# EAGLE board uMeadow_RevA (EAGLE 9.1.3), part 1 of 3
uMeadow eval Kit.
DATE: 09/16/2018; ENGINEER: S.JOHNSON; PART_NUMBER: uMeadow; REV: A
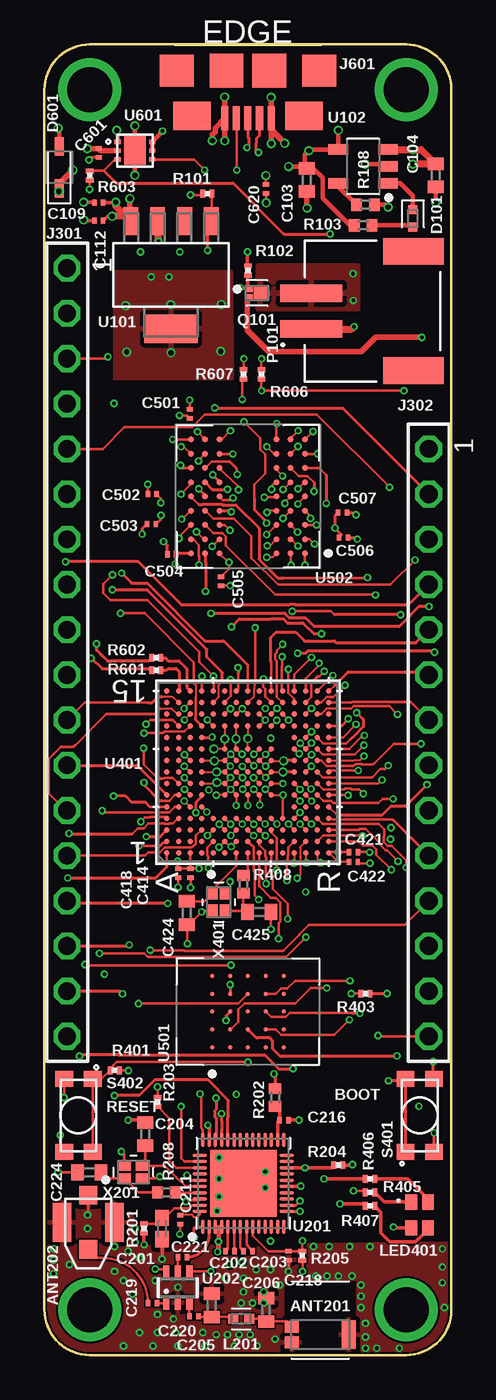
[diagram p0: board, top side]
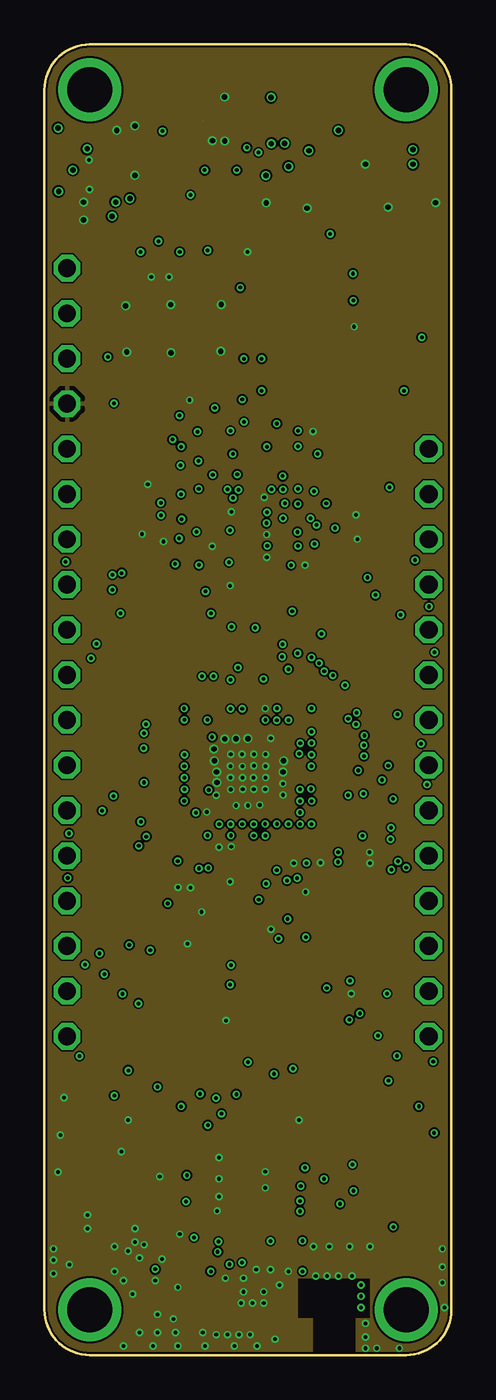
[diagram p1: board, inner layer Route2]
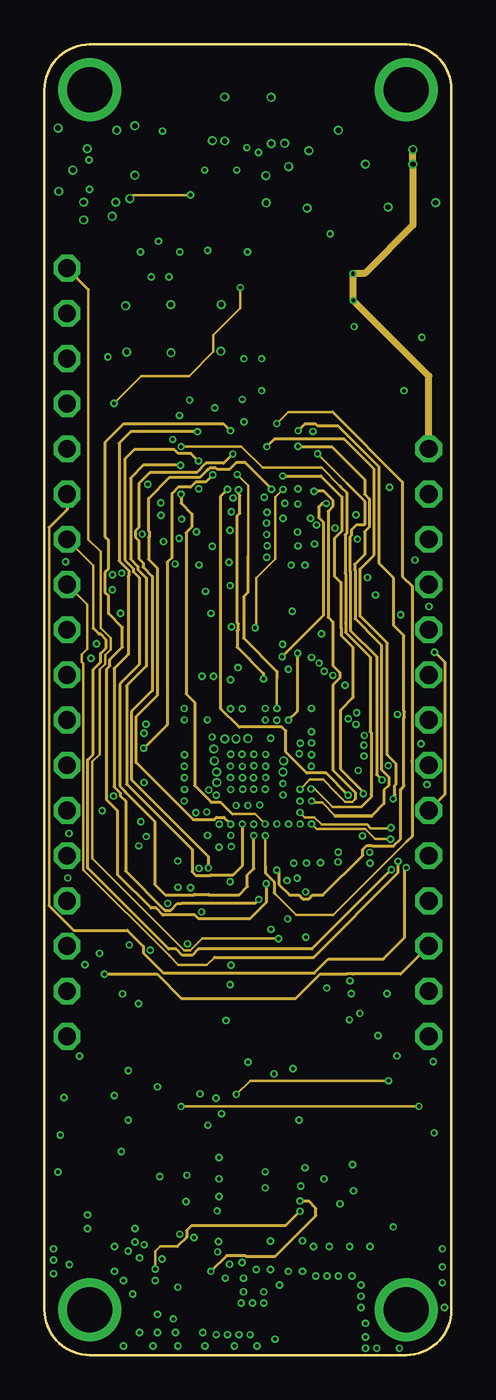
[diagram p2: board, inner layer Route3]
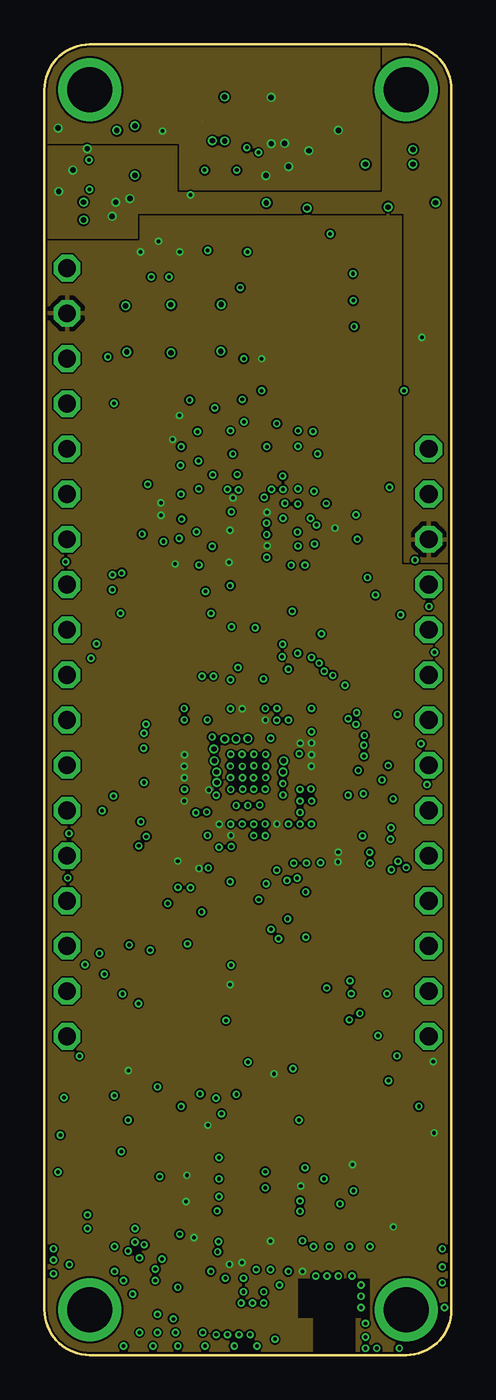
[diagram p3: board, inner layer Route14]
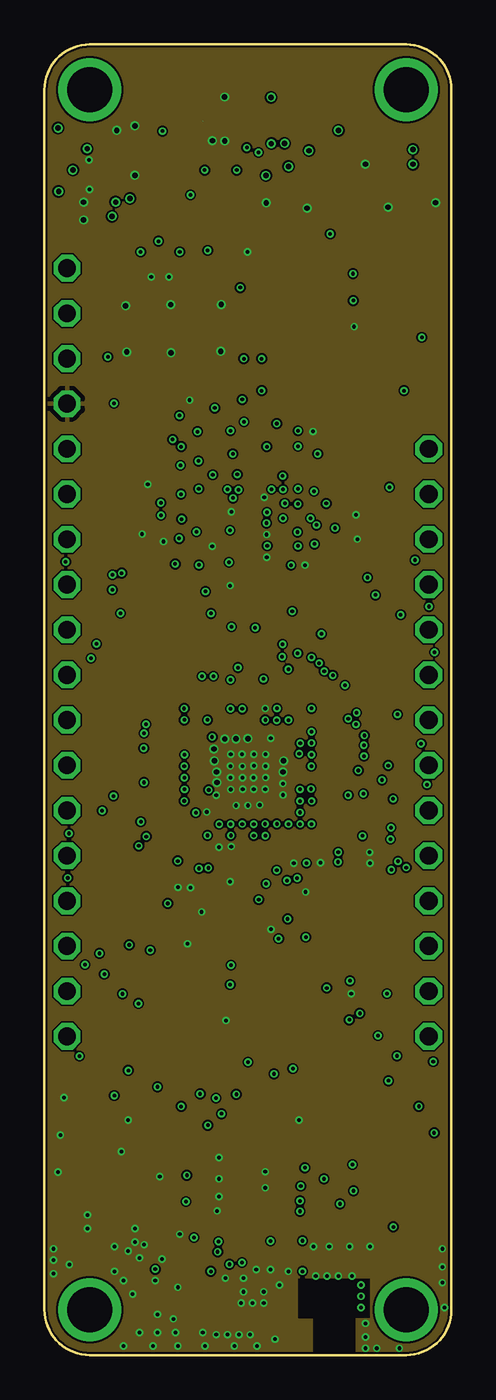
[diagram p4: board, inner layer Route15]
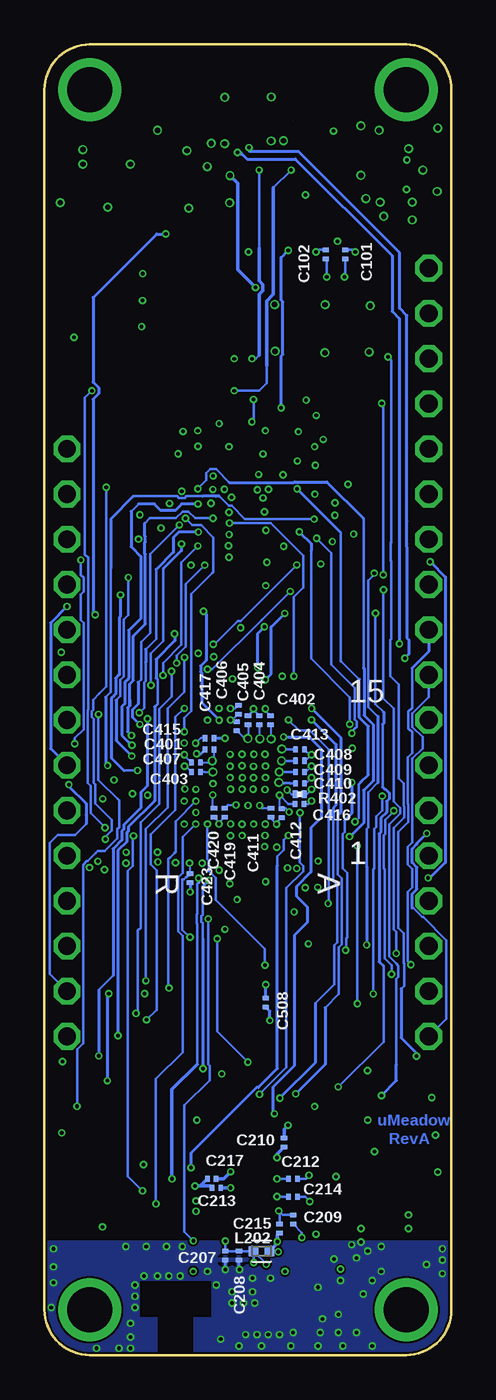
[diagram p5: board, bottom side, seen from below]

Size 22.86 x 73.66 mm. Coordinates in mm from the lower left corner, seen from the top.
Outline: 0,71.12 0,2.54 arc90 2.54,0 20.32,0 arc90 22.86,2.54 22.86,71.12 arc90 20.32,73.66 2.54,73.66 arc90 0,71.12
Copper layers (1*2+3*14+15*16): Top 0.035mm / dielectric 0.15mm / Route2 0.035mm / dielectric 0.15mm / Route3 0.035mm / dielectric 0.3mm / Route14 0.035mm / dielectric 0.15mm / Route15 0.035mm / dielectric 0.15mm / Bottom 0.035mm
Design rules "default *": minimum track width 0.1mm, minimum drill 0.15mm, track to track 0.1mm, track to pad 0.1mm, pad to pad 4mil, via to via 4mil, smd to smd 0mil, copper to edge 0.1mm, drill to drill 6mil, minimum pad ring 0.1mm, minimum via ring 4mil, stop-mask expansion 1mil, vias tented up to drill 20mil, thermal gap 10mil
Net classes: 1 USB: width 0.165 mm, drill 0.102 mm, clearance 0.254 mm; 2 MEM_ADDR_CNT: width 0.102 mm, drill 0.102 mm; 3 MEM_DATA: width 0.102 mm; 4 5V: width 0.1 mm; 5 50ohm: width 0.1 mm; 6 POWER: width 0.1 mm, drill 0.203 mm; 7 CLK: width 0.1 mm, drill 0.203 mm; 8 ANT: clearance 0.3 mm

## Footprints (pad centres in the part's own frame; a part is rotated, then mirrored left to right if it is on the bottom)
W3008 = smd 0.8 x 0.65: 1 1.6,-0.425; 2 1.6,0.425 | smd 0.8 x 1.6: 3 -1.6,0
A-1JB = smd 2.2 x 1.05: GND 0,1.475; GND2 0,-1.475 | smd 1.05 x 1: GND1 -1.525,0; SIG 1.525,0
C0201 = smd 0.25 x 0.35: 1 -0.25,0; 2 0.25,0
C0402 = smd 0.7 x 0.9: 1 -0.65,0; 2 0.65,0
C0402K = smd 0.925 x 0.74: 1 -0.6,0; 2 0.6,0
LEDC1005X50 = smd 0.5 x 0.5: 1 -0.5,0; 2 0.5,0
SOD2512X117 = smd 1.054 x 0.53: 1 -1.181,0; 2 1.181,0
TSW-118-XX-G-S = drill 1 pad 1.5 octagon: 1 21.59,0; 2 19.05,0; 3 16.51,0; 4 13.97,0; 5 11.43,0; 6 8.89,0; 7 6.35,0; 8 3.81,0; 9 1.27,0; 10 -1.27,0; 11 -3.81,0; 12 -6.35,0; 13 -8.89,0; 14 -11.43,0; 15 -13.97,0; 16 -16.51,0; 17 -19.05,0; 18 -21.59,0
TSW-114-XX-G-S = drill 1 pad 1.5 octagon: 1 16.51,0; 2 13.97,0; 3 11.43,0; 4 8.89,0; 5 6.35,0; 6 3.81,0; 7 1.27,0; 8 -1.27,0; 9 -3.81,0; 10 -6.35,0; 11 -8.89,0; 12 -11.43,0; 13 -13.97,0; 14 -16.51,0
USB_OTG = smd 0.4 x 1.35: 1 -1.3,2.675; 2 -0.65,2.675; 3 0,2.675; 4 0.65,2.675; 5 1.3,2.675 | smd 2.1 x 1.6: SHD1 3.15,2.55; SHD2 -3.15,2.55 | smd 1.9 x 1.9: SHD3 1.2,0; SHD4 -1.2,0 | smd 1.9 x 1.8: SHD5 -4,0; SHD6 4,0
L0402 = smd 0.556 x 0.559: 1 -0.452,0; 2 0.452,0
LTST-C19HE1WT = smd 0.65 x 0.85: 1 -0.475,0.725; 2 0.475,0.725; 3 0.475,-0.725; 4 -0.475,-0.725
MTH_100_140MIL = drill 2.54 pad 3.556: P$1 0,0
JST_S2B-PH-SM4-TB(LF)(SN) = smd 1 x 3.5: 1 1,0; 2 -1,0 | smd 1.5 x 3.4: P1 3.35,5.75; P2 -3.35,5.75
DFN120X80X50-3 = smd 0.36 x 0.35: 1 -0.42,0.225; 2 -0.42,-0.225 | smd 0.76 x 0.772: 3 0.195,0
R0201 = smd 0.28 x 0.43: 1 -0.255,0; 2 0.255,0
R0402 = smd 0.6 x 0.7: 1 -0.5,0; 2 0.5,0
KMR211NG = smd 0.9 x 1: 1 -2.05,0.8; 2 2.05,0.8; 3 2.05,-0.8; 4 -2.05,-0.8
SOT150P696X180-5N = smd 1.6 x 0.838: 1 -3.023,2.261; 2 -3.023,0.762; 3 -3.023,-0.762; 4 -3.023,-2.261 | smd 1.6 x 2.997: 5 3.023,0
SOT95P270X145-5 = smd 1.1 x 0.6: 1 -1.4,0.95; 2 -1.4,0; 3 -1.4,-0.95; 4 1.4,-0.95; 5 1.4,0.95
QFN35P500X500X90-49N = smd 0.81 x 0.2: 1 -2.445,2.275; 2 -2.445,1.925; 3 -2.445,1.575; 4 -2.445,1.225; 5 -2.445,0.875; 6 -2.445,0.525; 7 -2.445,0.175; 8 -2.445,-0.175; 9 -2.445,-0.525; 10 -2.445,-0.875; 11 -2.445,-1.225; 12 -2.445,-1.575; 13 -2.445,-1.925; 14 -2.445,-2.275; 25 2.445,-2.275; 26 2.445,-1.925; 27 2.445,-1.575; 28 2.445,-1.225; 29 2.445,-0.875; 30 2.445,-0.525; 31 2.445,-0.175; 32 2.445,0.175; 33 2.445,0.525; 34 2.445,0.875; 35 2.445,1.225; 36 2.445,1.575; 37 2.445,1.925; 38 2.445,2.275 | smd 0.2 x 0.81: 15 -1.575,-2.445; 16 -1.225,-2.445; 17 -0.875,-2.445; 18 -0.525,-2.445; 19 -0.175,-2.445; 20 0.175,-2.445; 21 0.525,-2.445; 22 0.875,-2.445; 23 1.225,-2.445; 24 1.575,-2.445; 39 1.575,2.445; 40 1.225,2.445; 41 0.875,2.445; 42 0.525,2.445; 43 0.175,2.445; 44 -0.175,2.445; 45 -0.525,2.445; 46 -0.875,2.445; 47 -1.225,2.445; 48 -1.575,2.445 | smd 3.75 x 3.75: 49 0,0
SC70-6L = smd 0.35 x 0.8: 1 -0.65,-0.85; 2 0,-0.85; 3 0.65,-0.85; 4 0.65,0.85; 5 0,0.85; 6 -0.65,0.85
UFBGA-176 = smd 0.3 x 0.3: A1 -4.55,4.55; A2 -3.9,4.55; A3 -3.25,4.55; A4 -2.6,4.55; A5 -1.95,4.55; A6 -1.3,4.55; A7 -0.65,4.55; A8 0,4.55; A9 0.65,4.55; A10 1.3,4.55; A11 1.95,4.55; A12 2.6,4.55; A13 3.25,4.55; A14 3.9,4.55; A15 4.55,4.55; B1 -4.55,3.9; B2 -3.9,3.9; B3 -3.25,3.9; B4 -2.6,3.9; B5 -1.95,3.9; B6 -1.3,3.9; B7 -0.65,3.9; B8 0,3.9; B9 0.65,3.9; B10 1.3,3.9; B11 1.95,3.9; B12 2.6,3.9; B13 3.25,3.9; B14 3.9,3.9; B15 4.55,3.9; C1 -4.55,3.25; C2 -3.9,3.25; C3 -3.25,3.25; C4 -2.6,3.25; C5 -1.95,3.25; C6 -1.3,3.25; C7 -0.65,3.25; C8 0,3.25; C9 0.65,3.25; C10 1.3,3.25; C11 1.95,3.25; C12 2.6,3.25; C13 3.25,3.25; C14 3.9,3.25; C15 4.55,3.25; D1 -4.55,2.6; D2 -3.9,2.6; D3 -3.25,2.6; D4 -2.6,2.6; D5 -1.95,2.6; D6 -1.3,2.6; D7 -0.65,2.6; D8 0,2.6; D9 0.65,2.6; D10 1.3,2.6; D11 1.95,2.6; D12 2.6,2.6; D13 3.25,2.6; D14 3.9,2.6; D15 4.55,2.6; E1 -4.55,1.95; E2 -3.9,1.95; E3 -3.25,1.95; E4 -2.6,1.95; E12 2.6,1.95; E13 3.25,1.95; E14 3.9,1.95; E15 4.55,1.95; F1 -4.55,1.3; F2 -3.9,1.3; F3 -3.25,1.3; F4 -2.6,1.3; F6 -1.3,1.3; F7 -0.65,1.3; F8 0,1.3; F9 0.65,1.3; F10 1.3,1.3; F12 2.6,1.3; F13 3.25,1.3; F14 3.9,1.3; F15 4.55,1.3; G1 -4.55,0.65; G2 -3.9,0.65; G3 -3.25,0.65; G4 -2.6,0.65; G6 -1.3,0.65; G7 -0.65,0.65; G8 0,0.65; G9 0.65,0.65; G10 1.3,0.65; G12 2.6,0.65; G13 3.25,0.65; G14 3.9,0.65; G15 4.55,0.65; H1 -4.55,0; H2 -3.9,0; H3 -3.25,0; H4 -2.6,0; H6 -1.3,0; H7 -0.65,0; H8 0,0; H9 0.65,0; H10 1.3,0; H12 2.6,0; H13 3.25,0; H14 3.9,0; H15 4.55,0; J1 -4.55,-0.65; J2 -3.9,-0.65; J3 -3.25,-0.65; J4 -2.6,-0.65; J6 -1.3,-0.65; J7 -0.65,-0.65; J8 0,-0.65; J9 0.65,-0.65; J10 1.3,-0.65; J12 2.6,-0.65; J13 3.25,-0.65; J14 3.9,-0.65; J15 4.55,-0.65; K1 -4.55,-1.3; K2 -3.9,-1.3; K3 -3.25,-1.3; K4 -2.6,-1.3; K6 -1.3,-1.3; K7 -0.65,-1.3; K8 0,-1.3; K9 0.65,-1.3; K10 1.3,-1.3; K12 2.6,-1.3; K13 3.25,-1.3; K14 3.9,-1.3; K15 4.55,-1.3; L1 -4.55,-1.95; L2 -3.9,-1.95; L3 -3.25,-1.95; L4 -2.6,-1.95; L12 2.6,-1.95; L13 3.25,-1.95; L14 3.9,-1.95; L15 4.55,-1.95; M1 -4.55,-2.6; M2 -3.9,-2.6; M3 -3.25,-2.6; M4 -2.6,-2.6; M5 -1.95,-2.6; M6 -1.3,-2.6; M7 -0.65,-2.6; M8 0,-2.6; M9 0.65,-2.6; M10 1.3,-2.6; M11 1.95,-2.6; M12 2.6,-2.6; M13 3.25,-2.6; M14 3.9,-2.6; M15 4.55,-2.6; N1 -4.55,-3.25; N2 -3.9,-3.25; N3 -3.25,-3.25; N4 -2.6,-3.25; N5 -1.95,-3.25; N6 -1.3,-3.25; N7 -0.65,-3.25; N8 0,-3.25; N9 0.65,-3.25; N10 1.3,-3.25; N11 1.95,-3.25; N12 2.6,-3.25; N13 3.25,-3.25; N14 3.9,-3.25; N15 4.55,-3.25; P1 -4.55,-3.9; P2 -3.9,-3.9; P3 -3.25,-3.9; P4 -2.6,-3.9; P5 -1.95,-3.9; P6 -1.3,-3.9; P7 -0.65,-3.9; P8 0,-3.9; P9 0.65,-3.9; P10 1.3,-3.9; P11 1.95,-3.9; P12 2.6,-3.9; P13 3.25,-3.9; P14 3.9,-3.9; P15 4.55,-3.9; R1 -4.55,-4.55; R2 -3.9,-4.55; R3 -3.25,-4.55; R4 -2.6,-4.55; R5 -1.95,-4.55; R6 -1.3,-4.55; R7 -0.65,-4.55; R8 0,-4.55; R9 0.65,-4.55; R10 1.3,-4.55; R11 1.95,-4.55; R12 2.6,-4.55; R13 3.25,-4.55; R14 3.9,-4.55; R15 4.55,-4.55
BGA25C100P5X5_800X600X120 = smd 0.25 x 0.25: A1 -2,2; A2 -1,2; A3 0,2; A4 1,2; A5 2,2; B1 -2,1; B2 -1,1; B3 0,1; B4 1,1; B5 2,1; C1 -2,0; C2 -1,0; C3 0,0; C4 1,0; C5 2,0; D1 -2,-1; D2 -1,-1; D3 0,-1; D4 1,-1; D5 2,-1; E1 -2,-2; E2 -1,-2; E3 0,-2; E4 1,-2; E5 2,-2
BGA81C80P9X9_800X800X120 = smd 0.35 x 0.35: A1 -3.2,3.2; A2 -2.4,3.2; A3 -1.6,3.2; A7 1.6,3.2; A8 2.4,3.2; A9 3.2,3.2; B1 -3.2,2.4; B2 -2.4,2.4; B3 -1.6,2.4; B7 1.6,2.4; B8 2.4,2.4; B9 3.2,2.4; C1 -3.2,1.6; C2 -2.4,1.6; C3 -1.6,1.6; C7 1.6,1.6; C8 2.4,1.6; C9 3.2,1.6; D1 -3.2,0.8; D2 -2.4,0.8; D3 -1.6,0.8; D7 1.6,0.8; D8 2.4,0.8; D9 3.2,0.8; E1 -3.2,0; E2 -2.4,0; E3 -1.6,0; E7 1.6,0; E8 2.4,0; E9 3.2,0; F1 -3.2,-0.8; F2 -2.4,-0.8; F3 -1.6,-0.8; F7 1.6,-0.8; F8 2.4,-0.8; F9 3.2,-0.8; G1 -3.2,-1.6; G2 -2.4,-1.6; G3 -1.6,-1.6; G7 1.6,-1.6; G8 2.4,-1.6; G9 3.2,-1.6; H1 -3.2,-2.4; H2 -2.4,-2.4; H3 -1.6,-2.4; H7 1.6,-2.4; H8 2.4,-2.4; H9 3.2,-2.4; J1 -3.2,-3.2; J2 -2.4,-3.2; J3 -1.6,-3.2; J7 1.6,-3.2; J8 2.4,-3.2; J9 3.2,-3.2
U-DFN2018-6 = smd 0.35 x 0.25: 1 -0.975,0.5; 2 -0.975,0; 3 -0.975,-0.5; 4 0.975,-0.5; 5 0.975,0; 6 0.975,0.5 | smd 1.2 x 1.6: TAB 0,0
OSCCC160X120X40 = smd 0.73 x 0.58: 1 -0.5,-0.35; 2 0.5,-0.35; 3 0.5,0.35; 4 -0.5,0.35

## Placement (x,y rotation side)
ANT201  w3008  [W3008]  15.49,1.14 180 top
ANT202  A-1JB  [A-1JB]  2.46,7.47 270 top
C101  0.1uF  [C0201]  5.96,61.87 270 bottom
C102  1uF  [C0201]  7.05,61.87 270 bottom
C103  4.7uF  [C0402]  14.73,66.04 270 top
C104  4.7uF  [C0402]  21.97,66.29 270 top
C109  0.1uF  [C0201]  3.05,64.77 180 top
C112  1uF  [C0201]  3.05,63.75 180 top
C201  3nF  [C0402K]  6.6,7.11 90 top
C202  0.1uF  [C0201]  10.41,5.84 0 top
C203  0.1uF  [C0201]  11.43,5.84 0 top
C204  8pF  [C0402]  5.65,12.43 90 top
C205  6pF  [C0402]  9.4,2.79 90 top
C206  6.2pF  [C0402]  12.45,2.54 90 top
C207  0.1uF  [C0201]  12.7,5.59 270 bottom
C208  1uF  [C0201]  11.94,5.59 270 bottom
C209  0.1uF  [C0201]  8.89,7.62 90 bottom
C210  1uF  [C0201]  9.4,11.94 270 bottom
C211  10nF  [C0201]  7.62,7.62 90 top
C212  1uF  [C0201]  8.89,9.91 180 bottom
C213  0.1uF  [C0201]  13.21,9.4 0 bottom
C214  0.1uF  [C0201]  8.89,8.89 180 bottom
C215  0.1uF  [C0201]  9.65,7.11 90 bottom
C216  0.1uF  [C0201]  13.46,13.21 0 top
C217  100pF  [C0201]  13.46,9.91 0 bottom
C218  0.1uF  [C0201]  13.72,5.59 270 top
C219  100pF  [C0201]  6.07,2.92 0 top
C220  100pF  [C0201]  8.41,2.18 180 top
C221  100pF  [C0201]  7.75,5.51 0 top
C224  8pF  [C0402]  2.51,10.28 180 top
C401  2.2uF  [C0201]  13.59,34.04 0 bottom
C402  2.2uF  [C0201]  10.16,35.69 270 bottom
C403  0.1uF  [C0201]  14.35,32.77 0 bottom
C404  1uF  [C0201]  10.79,35.69 270 bottom
C405  0.1uF  [C0201]  11.42,35.68 270 bottom
C406  0.1uF  [C0201]  11.97,36.27 90 bottom
C407  0.1uF  [C0201]  14.35,33.31 0 bottom
C408  0.1uF  [C0201]  8.51,33.4 180 bottom
C409  0.1uF  [C0201]  8.51,32.77 180 bottom
C410  0.1uF  [C0201]  8.51,32.13 180 bottom
C411  0.1uF  [C0201]  10.13,30.49 90 bottom
C412  0.1uF  [C0201]  9.53,30.46 90 bottom
C413  0.1uF  [C0201]  8.51,34.04 180 bottom
C414  0.1uF  [C0201]  8.2,27.09 270 top
C415  0.1uF  [C0201]  13.59,34.67 0 bottom
C416  0.1uF  [C0201]  8.52,30.97 180 bottom
C417  0.1uF  [C0201]  12.06,35.34 270 bottom
C418  0.1uF  [C0201]  7.51,27.09 270 top
C419  1uF  [C0201]  12.73,30.49 90 bottom
C420  0.1uF  [C0201]  13.34,30.48 90 bottom
C421  0.1uF  [C0201]  17.35,28.26 0 top
C422  1uF  [C0201]  17.35,27.72 0 top
C423  0.1uF  [C0201]  14.68,26.79 270 bottom
C424  8pF  [C0402]  8,24.85 270 top
C425  8pF  [C0402]  12.06,24.89 0 top
C501  0.1uF  [C0201]  8.16,52.91 90 top
C502  0.1uF  [C0201]  6.05,48.39 180 top
C503  0.1uF  [C0201]  6,46.7 180 top
C504  1uF  [C0201]  7.15,45 180 top
C505  0.1uF  [C0201]  9.92,43.49 270 top
C506  1uF  [C0201]  16.79,45.94 0 top
C507  0.1uF  [C0201]  16.74,47.35 0 top
C508  0.1uF  [C0201]  10.43,19.8 270 bottom
C601  0.1uF  [C0201]  3.05,67.56 270 top
C620  4.7uF  [C0201]  12.45,65.53 270 top
D101  QBLP595-O  [LEDC1005X50]  20.7,63.88 270 top
D601  BAT60JFILM  [SOD2512X117]  0.83,66.75 90 top
DRILEGEND  [DRILEGEND]  -127.52,-69.01 0 top  (outside the outline)
J301  TSW-118-07-G-S  [TSW-118-XX-G-S]  1.27,39.5 90 top
J302  TSW-114-07-G-S  [TSW-114-XX-G-S]  21.59,34.42 90 top
J601  USB_OTG_ZX62-AB-5PA  [USB_OTG]  11.43,72.19 180 top
L201  1.5nH  [L0402]  11.05,2.03 180 top
L202  2nh  [L0402]  10.67,5.84 180 bottom
LED401  LTST-C19HE1WT  [LTST-C19HE1WT]  21.08,7.87 0 top
MTH1  100MIL_140MIL  [MTH_100_140MIL]  2.54,2.54 0 top
MTH2  100MIL_140MIL  [MTH_100_140MIL]  20.32,2.54 0 top
MTH3  100MIL_140MIL  [MTH_100_140MIL]  2.54,71.12 0 top
MTH4  100MIL_140MIL  [MTH_100_140MIL]  20.32,71.12 0 top
P101  S2B-PH-SM4-TB(LF)(SN)  [JST_S2B-PH-SM4-TB(LF)(SN)]  14.99,58.67 270 top
Q101  SSM3J46CTB  [DFN120X80X50-3]  11.94,59.69 0 top
R101  10K  [R0201]  9.14,65.28 180 top
R102  10K  [R0201]  11.43,60.96 270 top
R103  470  [R0402]  17.91,63.5 0 top
R108  4.7K  [R0402]  18.03,64.64 0 top
R201  20K  [R0201]  5.59,7.11 270 top
R202  00  [R0402]  12.95,14.48 270 top
R203  499  [R0201]  6.35,14.22 90 top
R204  20K  [R0201]  16.51,10.67 180 top
R205  10K  [R0201]  14.48,5.59 270 top
R208  00  [R0402]  6.86,9.14 180 top
R401  10K  [R0201]  3.94,16 0 top
R402  10K  [R0201]  8.52,31.52 180 bottom
R403  10K  [R0201]  18.03,20.32 0 top
R405  620  [R0201]  18.29,9.14 0 top
R406  300  [R0201]  18.29,9.91 0 top
R407  300  [R0201]  18.29,8.38 0 top
R408  00  [R0402]  11.18,26.45 90 top
R601  0R  [R0201]  6.28,38.49 180 top
R602  0R  [R0201]  6.27,39.18 180 top
R603  10K  [R0201]  2.54,66.29 90 top
R606  47K  [R0201]  12.19,55.12 90 top
R607  0R  [R0201]  11.18,55.12 90 top
S401  SPST_SW_KMR211NG_LFS  [KMR211NG]  21.08,13.46 90 top
S402  SPST_SW_KMR211NG_LFS  [KMR211NG]  1.91,13.46 270 top
U101  LP38693MP-3.3  [SOT150P696X180-5N]  7.11,60.71 270 top
U102  MCP7381-2-0T  [SOT95P270X145-5]  17.91,66.8 180 top
U201  ESP32-D2WD  [QFN35P500X500X90-49N]  11.18,9.65 90 top
U202  SKYA21001  [SC70-6L]  7.49,3.78 0 top
U401  STM32F777  [UFBGA-176]  11.43,32.77 90 top
U501  32MB  [BGA25C100P5X5_800X600X120]  11.43,19.3 90 top
U502  32MB  [BGA81C80P9X9_800X800X120]  11.43,48.26 180 top
U601  AP2151  [U-DFN2018-6]  5.08,67.69 0 top
X201  ABM12W-40  [OSCCC160X120X40]  5,10.28 0 top
X401  ABM12W-25  [OSCCC160X120X40]  9.8,25.46 270 top

## Library data of the parts
ANT201 = SLJ_wireless; MANUFACTURER: PulseLarsen; PART_NUMBER: W3008
ANT202 = SLJ_wireless; MANUFACTURER: amphenol RF; PART_NUMBER: A-1JB
C101 = eagle-ltspice; FOOTPRINT: 0201; MANUFACTURER: Murata Electronica; PART_NUMBER: GRM033C71A104KE14D; SPICEMODEL: NONE; SPICEPREFIX: C; VOLTAGE: 10V
C102 C112 C208 C210 C212 C404 C419 C422 C504 C506 = eagle-ltspice; FOOTPRINT: 0201; MANUFACTURER: Murata Electronica; PART_NUMBER: GRT033R60J105ME13D; SPICEMODEL: NONE; SPICEPREFIX: C; VOLTAGE: 6.3V
C103 C104 = rcl; MANUFACTURER: MURATA; PACKAGE: 0402; PART_NUMBER: GRM155R60J475ME87D; SPICEPREFIX: C
C109 C207 C209 C213-C216 C218 C403 C405-C418 C420 C421 C423 C501-C503 C505 C507 C508 C601 = eagle-ltspice; FOOTPRINT: 0201; MANUFACTURER: Murata Electronica; PART_NUMBER: GRM033R61A104ME15D; SPICEMODEL: NONE; SPICEPREFIX: C; VOLTAGE: 10V
C201 = rcl; FOOTPRINT: 0402; MANUFACTURER: MURATA; PART_NUMBER: GRM1557U1A302JA01D; SPICEPREFIX: C
C202 C203 = eagle-ltspice; DNI: DNI; FOOTPRINT: 0201; MANUFACTURER: Murata Electronica; PART_NUMBER: GRM033R61A104ME15D; SPICEMODEL: NONE; SPICEPREFIX: C; VOLTAGE: 10V
C204 C224 C424 C425 = eagle-ltspice; FOOTPRINT: 0402; MANUFACTURER: Murata Electronica; PART_NUMBER: GRM1555C1H8R0DA01D; SPICEMODEL: NONE; SPICEPREFIX: C; VOLTAGE: 50V
C205 = eagle-ltspice; FOOTPRINT: 0402; MANUFACTURER: Murata Electronica; PART_NUMBER: GJM1555C1H6R0BB01D; SPICEMODEL: NONE; SPICEPREFIX: C; VOLTAGE: 50V
C206 = eagle-ltspice; FOOTPRINT: 0402; MANUFACTURER: Murata Electronica; PART_NUMBER: GRM1555C1H6R2BA01D; SPICEMODEL: NONE; SPICEPREFIX: C; VOLTAGE: 50V
C211 = eagle-ltspice; FOOTPRINT: 0201; MANUFACTURER: TDK; PART_NUMBER: C0603X7R1A103K030BA; SPICEMODEL: NONE; SPICEPREFIX: C; VOLTAGE: 10V
C217 = eagle-ltspice; FOOTPRINT: 0201; MANUFACTURER: Murata Electronica; PART_NUMBER: GRM0335C1H101JA01D; SPICEMODEL: NONE; SPICEPREFIX: C; VOLTAGE: 50V
C219-C221 = eagle-ltspice; FOOTPRINT: 0201; MANUFACTURER: TDK; PART_NUMBER: CGA1A2X7R1H101M030BA; SPICEMODEL: NONE; SPICEPREFIX: C; VOLTAGE: 10V
C401 C402 = eagle-ltspice; FOOTPRINT: 0201; MANUFACTURER: Murata Electronica; PART_NUMBER: GRM033R61A225KE47D; SPICEMODEL: NONE; SPICEPREFIX: C; VOLTAGE: 10V
C620 = eagle-ltspice; FOOTPRINT: 0201; MANUFACTURER: Murata Electronica; PART_NUMBER: GRM035R60J475ME15D; SPICEMODEL: NONE; SPICEPREFIX: C; VOLTAGE: 6.3V
D101 = SLJ_Diodes; COLOR: ORANGE; MANUFACTURER: QT BRIGHTEK; PART_NUMBER: QBLP595-O
D601 = SLJ_Diodes; MANUFACTURER: STMicroelectronics; PART_NUMBER: BAT60JFILM
DRILEGEND = drilegend
J301 = con-samtec; DNI: DNI; MANUFACTURER: Samtec; MF: Samtec Inc.; MPN: TSW-118-07-G-S; PART_NUMBER: TSW-118-07-G-S
J302 = con-samtec; DNI: DNI; MF: Samtec Inc.; MPN: TSW-114-07-G-S
J601 = SLJ_Connectors; MANUFACTURER: Hirose Electric Co.; PART_NUMBER: ZX62-AB-5PA(31)
L201 = SLJ_passives; CURRENT: 300mA; FOOTPRINT: 0402; MANUFACTURER: Johanson Technology; PART_NUMBER: L-07C1N5SV6T
L202 = SLJ_passives; CURRENT: 900mA; FOOTPRINT: 0402; MANUFACTURER: Murata Electronics; PART_NUMBER: LQG15HS2N0S02D
LED401 = SLJ_Diodes; MANUFACTURER: LITE-ON; PART_NUMBER: LTST-C19HE1WT
MTH1-MTH4 = SLJ_MECH; DNI: DNI
P101 = SLJ_Connectors; DESCRIPTION: PH Series 2 Position 2 mm Pitch Surface Mount Side Entry Shrouded Header; MANUFACTURER: JST; PACKAGE: FakePackage u; PART_NUMBER: S2B-PH-SM4-TB_LF__SN_; PRICE: None
Q101 = SLJ_TRANSISTORS; CURRENT: 2A; MANUFACTURER: Toshiba Semiconductor; PART_NUMBER: SSM3J46CTB(TPL3); VOLTAGE: 20V
R101 R102 R205 R401-R403 R603 = rcl; FOOTPRINT: 0201; MANUFACTURER: Panasonic; PART_NUMBER: ERJ-1GEF1002C; SPICEPREFIX: R
R103 = rcl; FOOTPRINT: 0402; MANUFACTURER: Samsung; PART_NUMBER: RC1005J471CS; SPICEPREFIX: R
R108 = rcl; FOOTPRINT: 0402; MANUFACTURER: Panasonic; PART_NUMBER: ERA-2AEB472X; SPICEPREFIX: R
R201 R204 = rcl; FOOTPRINT: 0201; MANUFACTURER: YAGEO; PART_NUMBER: RC0201FR-0720KL; SPICEPREFIX: R
R202 R208 R408 = rcl; FOOTPRINT: 0402; MANUFACTURER: Panasonic; PART_NUMBER: ERJ-2GE0R00X; SPICEPREFIX: R
R203 = rcl; FOOTPRINT: 0201; MANUFACTURER: PANASONIC; PART_NUMBER: ERJ-1GNF4990C; SPICEPREFIX: R
R405 = rcl; FOOTPRINT: 0201; MANUFACTURER: Yageo; PART_NUMBER: RC0201JR-07620RL; SPICEPREFIX: R
R406 R407 = rcl; FOOTPRINT: 0201; MANUFACTURER: Yageo; PART_NUMBER: RC0201FR-07300RL; SPICEPREFIX: R
R601 R602 R607 = rcl; FOOTPRINT: 0201; MANUFACTURER: Panasonic; PART_NUMBER: ERJ-1GN0R00C; SPICEPREFIX: R
R606 = rcl; FOOTPRINT: 0201; MANUFACTURER: Samsung Electro-Mechanics; PART_NUMBER: RC0603F473CS; SPICEPREFIX: R
S401 S402 = SLJ_SWITCHES; MANUFACTURER: C&K; PART_NUMBER: KMR211NG LFS
U101 = LP38693MP-3.3; DESCRIPTION: 500mA Low Dropout CMOS Linear Regulators Stable with Ceramic Output Capacitors 5-SOT-223 -40 to 125; MANUFACTURER: Texas Instruments; PACKAGE: SOT-223 Texas Instruments; PART_NUMBER: LP38693MP-3.3/NOPB; PRICE: None
U102 = SLJ_PMIC; MANUFACTURER: MicroChip; PART_NUMBER: MCP73831T-2ACI/OT
U201 = SLJ_wireless; MANUFACTURER: Espressif Systems; PART_NUMBER: ESP32-D2WD
U202 = SLJ_wireless; MANUFACTURER: Skyworks Solutions; PART_NUMBER: SKYA21001
U401 = STM32_MCU; MANUFACTURER: STMicroelectronics; PART_NUMBER: STM32F777IIK6
U501 = SLJ_Memory; MANUFACTURER: Cypress Semiconductor; PART_NUMBER: S25FL256LAGBHV030
U502 = SLJ_Memory; MANUFACTURER: ISSI; PART_NUMBER: IS42S16160J-7BLI; VOLTAGE: 3.3V
U601 = SLJ_PMIC; MANUFACTURER: Diodes Inc; PART_NUMBER: AP2151DFMG-7
X201 = SLJ_OSC; MANUFACTURER: Abracon LLC; PART_NUMBER: ABM12W-40.0000MHZ-6-B1U-T3
X401 = SLJ_OSC; MANUFACTURER: Abracon LLC; PART_NUMBER: ABM12W-25.0000MHZ-6-B1U-T3

## Nets
+3V3 [POWER]: C101.1 C102.1 C207.1 C208.1 C209.1 C210.1 C212.1 C213.1 C214.1 C217.1 C403.1 C404.1 C405.1 C406.1 C407.1 C408.1 C409.1 C410.1 C411.1 C412.1 C413.1 C414.1 C415.1 C416.1 C417.1 C418.1 C419.1 C420.1 C421.1 C422.1 C501.1 C502.1 C503.1 C504.1 C505.1 C506.1 C507.1 C508.1 J301.2 L202.2 LED401.4 R202.1 R204.1 R205.2 R401.2 R402.2 R606.2 S401.3 S401.4 U101.3 U201.1 U201.19 U201.37 U201.43 U201.46 U401.C1 U401.C5 U401.C7 U401.C8 U401.C9 U401.F3 U401.G3 U401.G13 U401.H13 U401.J12 U401.J13 U401.K4 U401.N8 U401.N9 U401.N10 U401.R1 U501.B4 U502.A7 U502.A9 U502.B3 U502.C7 U502.D3 U502.E7 U502.J9
+5V [5V]: C109.1 C112.1 C601.1 D601.1 J302.3 Q101.2 R101.2 U101.4 U601.2
+VBAT [CLK]: C104.1 J302.1 P101.2 Q101.3 U102.3
+VBUS [POWER]: C103.1 C620.1 D601.2 J601.1 Q101.1 R102.2 R103.1 U102.4 U401.E15 U601.5 U601.6
+VREF [MEM_DATA]: C423.1 J301.3 U401.N1
ADC1_IN3 [MEM_DATA]: J301.7 U401.R2
ADC1_IN7 [MEM_DATA]: J301.8 U401.R3
ADC1_IN10 [MEM_DATA]: J301.9 U401.M2
ADC1_IN11 [MEM_DATA]: J301.10 U401.M3
CAN1_RX [MEM_DATA]: J301.17 U401.A5
CAN1_TX [MEM_DATA]: J301.18 U401.B4
DAC_OUT1 [MEM_DATA]: J301.5 U401.N4
DAC_OUT2 [MEM_DATA]: J301.6 U401.P4
EN_3V3: J302.2 R101.1 U101.1
ESP32:40MHZ_N: C204.1 U201.44 X201.3
ESP32:40MHZ_P: R208.1 U201.45
ESP32:CHIP_ANT_50OHM [ANT]: C205.1 C220.1 L201.2
ESP32:EXTANT_50OHM [ANT]: ANT202.SIG C219.1
ESP32:GPIO26: U201.15 U202.6
ESP32:GPIO27: U201.16 U202.4
ESP32:LNA_50OHM [ANT]: C221.2 U201.2
ESP32:N$1: C211.2 U201.48
ESP32:N$2: C201.2 R201.1 U201.47
ESP32:N$3: C203.2 U201.8
ESP32:N$4: C202.1 U201.5
ESP32:N$5: C202.2 U201.6
ESP32:N$6: C224.1 R208.2 X201.1
ESP32:N$7: C203.1 U201.7
ESP32:N$8 [ANT]: ANT201.1 C206.1 L201.1
ESP32:N$9 [MEM_DATA]: U201.10
ESP32:N$10: R203.1 U201.41
ESP32:N$11: C215.1 L202.1 U201.3 U201.4
ESP32:N$12 [MEM_DATA]: U201.11
ESP32:N$13: C220.2 U202.3
ESP32:N$14: C219.2 U202.1
ESP32:N$15: C221.1 U202.5
ESP32:N$17: C216.1 R202.2 U201.26
ESP32_BOOT_L: R204.2 U201.22 U401.E3
ESP32_RESET_L: C218.1 R205.1 U201.9 U401.K1
ESP32_UART5: R203.2 U401.D12
FLASH_CLK [CLK]: U401.M6 U501.B2
FLASH_CS_L [CLK]: U401.R12 U501.C2
FMC_A0 [MEM_ADDR_CNT]: U401.E2 U502.H7
FMC_A1 [MEM_ADDR_CNT]: U401.H3 U502.H8
FMC_A2 [MEM_ADDR_CNT]: U401.H2 U502.J8
FMC_A3 [MEM_ADDR_CNT]: U401.J2 U502.J7
FMC_A4 [MEM_ADDR_CNT]: U401.J3 U502.J3
FMC_A5 [MEM_ADDR_CNT]: U401.K3 U502.J2
FMC_A6 [MEM_ADDR_CNT]: U401.P6 U502.H3
FMC_A7 [MEM_ADDR_CNT]: U401.N6 U502.H2
FMC_A8 [MEM_ADDR_CNT]: U401.R7 U502.H1
FMC_A9 [MEM_ADDR_CNT]: U401.P7 U502.G3
FMC_A10 [MEM_ADDR_CNT]: U401.N7 U502.H9
FMC_A11 [MEM_ADDR_CNT]: U401.M7 U502.G2
FMC_A12 [MEM_ADDR_CNT]: U401.L15 U502.G1
FMC_A13 [MEM_ADDR_CNT]: U502.E2
FMC_A14 [MEM_ADDR_CNT]: U401.K14 U502.G7
FMC_A15 [MEM_ADDR_CNT]: U401.K13 U502.G8
FMC_CAS_L [MEM_ADDR_CNT]: U401.B7 U502.F7
FMC_CKE_L [MEM_ADDR_CNT]: U401.F4 U502.F3
FMC_CLK [MEM_ADDR_CNT]: U401.H14 U502.F2
FMC_CS_L [MEM_ADDR_CNT]: U401.G4 U502.G9
FMC_D0 [MEM_DATA]: U401.M14 U502.A8
FMC_D1 [MEM_DATA]: U401.L14 U502.B9
FMC_D2 [MEM_DATA]: U401.B12 U502.B8
FMC_D3 [MEM_DATA]: U401.C12 U502.C9
FMC_D4 [MEM_DATA]: U401.R8 U502.C8
FMC_D5 [MEM_DATA]: U401.P8 U502.D9
FMC_D6 [MEM_DATA]: U401.P9 U502.D8
FMC_D7 [MEM_DATA]: U401.R9 U502.E9
FMC_D8 [MEM_DATA]: U401.P10 U502.E1
FMC_D9 [MEM_DATA]: U401.R10 U502.D2
FMC_D10 [MEM_DATA]: U401.N11 U502.D1
FMC_D11 [MEM_DATA]: U401.P11 U502.C2
FMC_D12 [MEM_DATA]: U401.R11 U502.C1
FMC_D13 [MEM_DATA]: U401.P15 U502.B2
FMC_D14 [MEM_DATA]: U401.P14 U502.B1
FMC_D15 [MEM_DATA]: U401.N15 U502.A2
FMC_DQMH [MEM_DATA]: U401.A3 U502.F1
FMC_DQML [MEM_DATA]: U401.A4 U502.E8
FMC_RAS_L [MEM_ADDR_CNT]: U401.R6 U502.F8
FMC_WE [MEM_ADDR_CNT]: U401.J4 U502.F9
GND [POWER]: ANT201.2 ANT201.3 ANT202.GND ANT202.GND1 ANT202.GND2 C101.2 C102.2 C103.2 C104.2 C109.2 C112.2 C201.1 C204.2 C205.2 C206.2 C207.2 C208.2 C209.2 C210.2 C211.1 C212.2 C213.2 C214.2 C215.2 C216.2 C217.2 C218.2 C224.2 C401.2 C402.2 C403.2 C404.2 C405.2 C406.2 C407.2 C408.2 C409.2 C410.2 C411.2 C412.2 C413.2 C414.2 C415.2 C416.2 C417.2 C418.2 C419.2 C420.2 C421.2 C422.2 C423.2 C424.2 C425.2 C501.2 C502.2 C503.2 C504.2 C505.2 C506.2 C507.2 C508.2 C601.2 C620.2 J301.4 J601.5 P101.1 R102.1 R108.2 R201.2 R403.1 R603.1 S402.3 S402.4 U101.5 U102.2 U201.49 U202.2 U401.D5 U401.D7 U401.D8 U401.D9 U401.F2 U401.F6 U401.F7 U401.F8 U401.F9 U401.F10 U401.F12 U401.G2 U401.G6 U401.G7 U401.G8 U401.G9 U401.G10 U401.G12 U401.H6 U401.H7 U401.H8 U401.H9 U401.H10 U401.H12 U401.J6 U401.J7 U401.J8 U401.J9 U401.J10 U401.K6 U401.K7 U401.K8 U401.K9 U401.K10 U401.L4 U401.M1 U401.M8 U401.M9 U401.P1 U501.B3 U502.A1 U502.A3 U502.B7 U502.C3 U502.D7 U502.E3 U502.J1 U601.1 U601.TAB X201.2 X201.4 X401.2 X401.4
I2C1_SCL [MEM_DATA]: J302.11 U401.B6
I2C1_SDA [MEM_DATA]: J302.12 U401.B5
PB0 [MEM_DATA]: J302.13 U401.R5
PB1 [MEM_DATA]: J302.10 U401.R4
PC6 [MEM_DATA]: J301.16 U401.H15
PC7 [MEM_DATA]: J302.14 U401.G15
PC9 [MEM_DATA]: J302.8 U401.F14
PE3 [MEM_DATA]: J302.4 U401.A1
PG3 [MEM_DATA]: J302.5 U401.K15
PH10 [MEM_DATA]: J302.9 U401.L13
POWER1:N$1: R108.1 U102.5
POWER1:N$2: D101.1 U102.1
POWER1:N$3: D101.2 R103.2
QUAD_SPI_IO0 [50ohm]: U401.N14 U501.D3
QUAD_SPI_IO1 [50ohm]: U401.N13 U501.D2
QUAD_SPI_IO2 [50ohm]: U401.A2 U501.C4
QUAD_SPI_IO3 [50ohm]: U401.M15 U501.D4
RESET_L [MEM_DATA]: J301.1 R401.1 S402.1 S402.2 U401.J1
SPI2_CS_L: U201.34 U401.E14
SPI2_MISO: U201.38 U401.C14
SPI2_MOSI: U201.36 U401.C13
SPI2_SCK: U201.35 U401.D11
SPI3_CLK [MEM_DATA]: J301.11 U401.B14
SPI3_MISO [MEM_DATA]: J301.13 U401.B13
SPI3_MOSI [MEM_DATA]: J301.12 U401.A6
STM32_MCU1:BLINKY_B: R407.1 U401.N3
STM32_MCU1:BLINKY_G: R406.1 U401.N2
STM32_MCU1:BLINKY_R: R405.1 U401.P2
STM32_MCU1:BOOT: R403.2 S401.1 S401.2 U401.D6
STM32_MCU1:I2C2_SCL: U401.H4
STM32_MCU1:I2C2_SDA: U401.R13
STM32_MCU1:N$1: C401.1 U401.M10
STM32_MCU1:N$2: C402.1 U401.F13
STM32_MCU1:N$7: LED401.1 R405.2
STM32_MCU1:N$8: R402.1 U401.C6
STM32_MCU1:N$9: LED401.2 R406.2
STM32_MCU1:N$11: LED401.3 R407.2
STM32_MCU1:N$14: C425.1 R408.1 X401.3
STM32_MCU1:NC_JTCK: U401.A14
STM32_MCU1:NC_JTDI: U401.A13
STM32_MCU1:NC_JTMS: U401.A15
STM32_MCU1:OSC_IN_PH0: C424.1 U401.G1 X401.1
STM32_MCU1:OSC_OUT_PH1: R408.2 U401.H1
STM32_MCU1:PC8_TIM8CH1: U401.G14
STM32_MCU1:PD5_BUT: U401.C11
UART4_RX [MEM_DATA]: J301.14 U401.D3
UART4_TX [MEM_DATA]: J301.15 U401.E12
UART5_ESP32: U201.40 U401.P13
USART1_RX [MEM_DATA]: J302.6 U401.R15
USART2_TX [MEM_DATA]: J302.7 U401.R14
USB_ID: R607.1 U401.D15
USB_N [USB]: R602.1 U401.C15
USB_OC: R606.1 U401.M4 U601.4
USB_OTG1:USB_ID: J601.4 R607.2
USB_OTG1:USB_N [USB]: J601.2 R602.2
USB_OTG1:USB_P [USB]: J601.3 R601.2
USB_P [USB]: R601.1 U401.B15
USB_PWR_ON: R603.2 U401.K12 U601.3